# Altium PCB Copy of TQ210_BOARD_V4-20121031.PcbDoc (part 5 of 8)
Units mm, origin at the board's own origin, x right, y up, seen from the top; angles counter-clockwise.
Board outline 191.2 x 131.27 mm, 2 copper layers (TopLayer, BottomLayer); 362 components, 455 nets, 1594 pads, 630 vias.
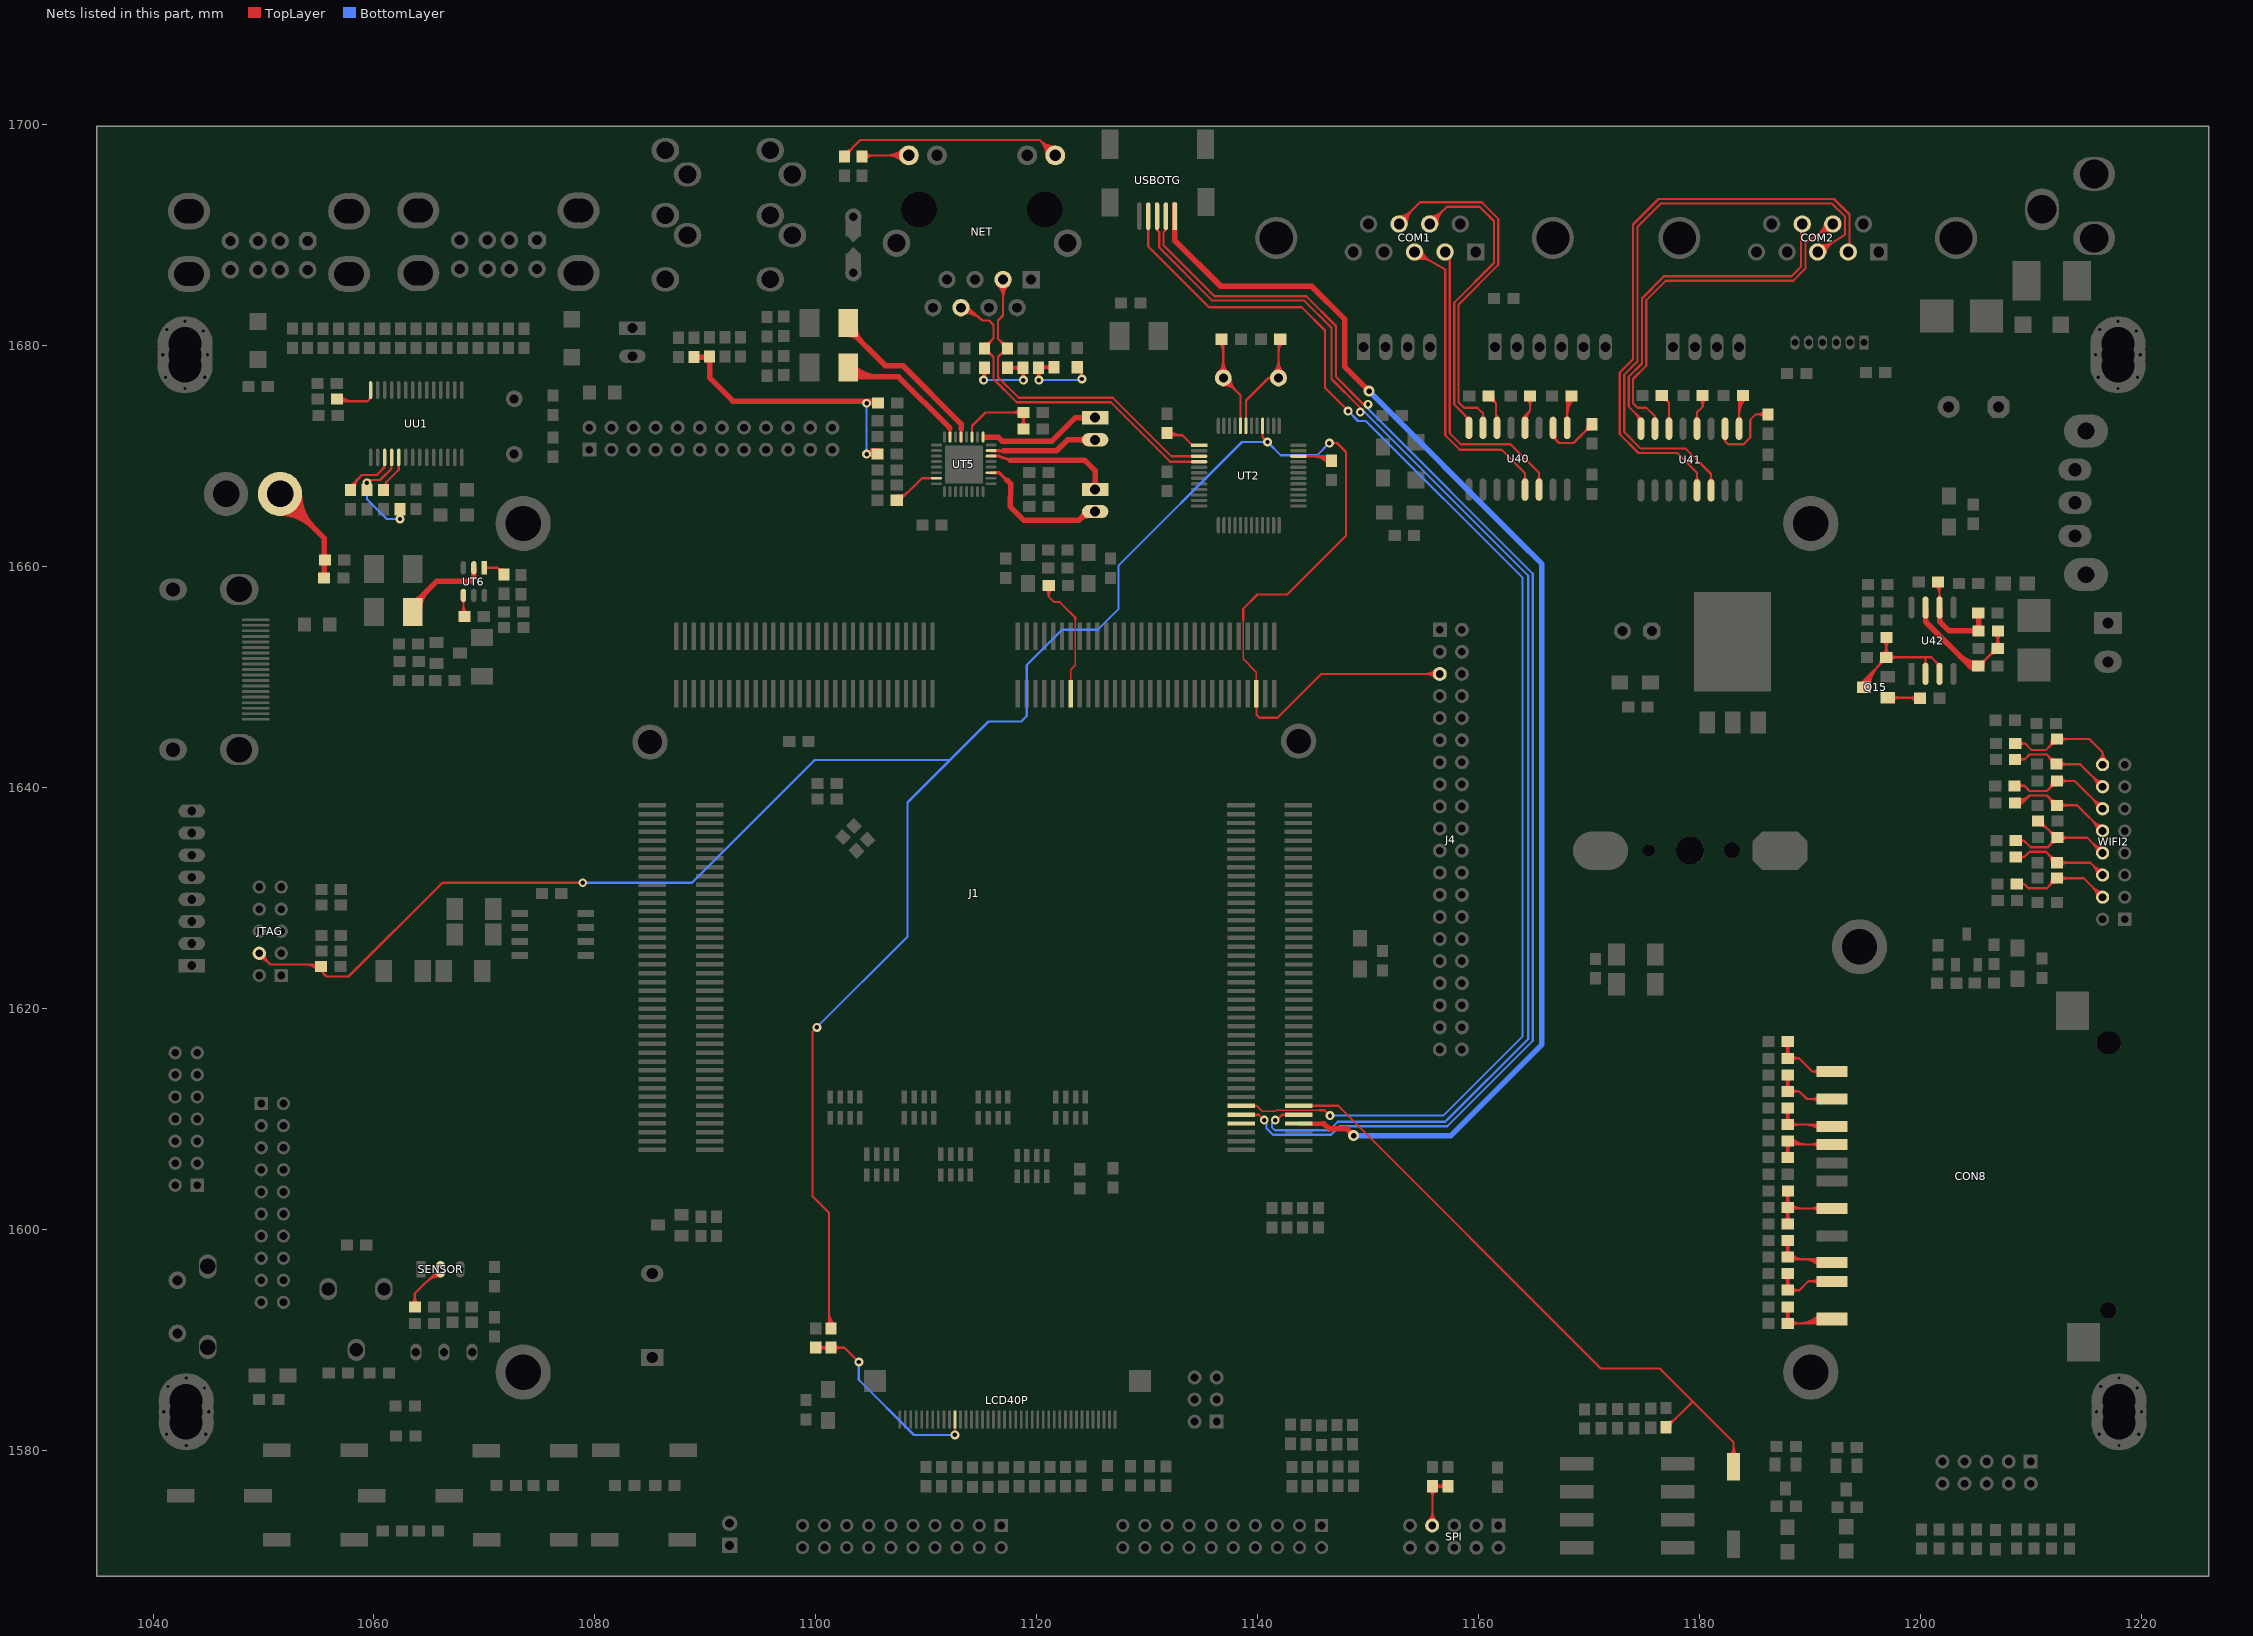
[diagram p5: the nets of this part, all layers, seen from the top]

## Via types
v1: diameter 1, hole 0.5, TopLayer to BottomLayer, 458 vias
v2: diameter 0.8, hole 0.4, TopLayer to BottomLayer, 172 vias

## Nets (pads, with @x,y where several pads share a name; then routed paths per layer and width w, separated by ;. In a path a pad name is that pad's centre, name@x,y a point inside that pad or via, vN(x,y) a via of type N, cw(c..) or ccw(c..) an arc to the next point about the centre after c; other vN are vias at no path point) (continued)
NetR31_1: LCD40P.11 R31.1 R32.1 | length 22.6
  TopLayer w0.2: R31.1@1100.2,1589.3 1102.6,1589.3 v2(1103.9,1588) ; R31.1@1100.283,1589.017 cw(c1100.966,1588.334) 1100.966,1589.3 cw(c1100.966,1590.266) R31.1@1100.283,1589.583 ; R32.1@1101.117,1589.017 ccw(c1100.434,1588.334) 1100.434,1589.3 ccw(c1100.434,1590.266) R32.1@1101.117,1589.583 ; R32.1@1101.683,1589.017 cw(c1102.366,1588.334) 1102.366,1589.3 cw(c1102.366,1590.266) R32.1@1101.683,1589.583 ; v2(1112.6,1581.4) LCD40P.11@1112.6,1582.8
  BottomLayer w0.2: v2(1103.9,1588) 1103.9,1586.4 1108.9,1581.4 v2(1112.6,1581.4)
NetR203_1: R203.1 UT2.34 | length 7.4
  TopLayer w0.2: UT2.34@1143.703,1670.004 1146.496,1670.004 R203.1@1146.5,1670 ; 1144.879,1670.004 cw(c1144.879,1667.829) R203.1@1146.417,1669.367 ; 1145.362,1670.004 cw(c1145.362,1668.312) R203.1@1146.559,1669.509 ; 1145.845,1670.004 cw(c1145.845,1668.795) R203.1@1146.7,1669.65 ; R203.1@1146.328,1670.004 cw(c1146.328,1669.278) R203.1@1146.841,1669.791
NetR206_2: CD2.1 R206.2 R207.2 | length 13.1
  TopLayer w0.2: CD2.1@1119.894,1677.682 cw(c1119.212,1676.999) 1120.177,1676.999 cw(c1121.143,1676.999) CD2.1@1120.46,1677.682 ; v2@1120.177,1676.923 CD2.1@1120.177,1678.015 ; CD2.1@1120.227,1678.065 R206.2@1121.577,1678.065 ; CD2.1@1120.46,1677.782 cw(c1121.143,1677.099) 1121.143,1678.065 cw(c1121.143,1679.031) CD2.1@1120.46,1678.348 ; R206.2@1121.294,1677.782 ccw(c1120.612,1677.099) 1120.612,1678.065 ccw(c1120.612,1679.031) R206.2@1121.294,1678.348 ; R207.2@1123.677,1678.015 cw(c1122.986,1677.17) v2@1124.072,1677.279 ; R207.2@1123.677,1678.065 1124,1678 v2(1124.1,1677)
  BottomLayer w0.2: v2(1120.2,1676.9) v2@1124.1,1676.9
NetR208_1: CD1.1 R208.1 R209.1 | length 13.2
  TopLayer w0.2: R209.1@1114.994,1677.682 cw(c1114.312,1676.999) 1115.277,1676.999 cw(c1116.243,1676.999) R209.1@1115.56,1677.682 ; v2@1115.277,1676.977 R209.1@1115.277,1678.015 ; R208.1@1117.377,1678.015 CD1.1@1118.777,1678.015 1118.777,1676.923 v2(1118.8,1676.9) ; R208.1@1117.66,1677.732 cw(c1118.343,1677.049) 1118.343,1678.015 cw(c1118.343,1678.981) R208.1@1117.66,1678.298 ; CD1.1@1118.494,1677.682 cw(c1117.812,1676.999) 1118.777,1676.999 cw(c1119.743,1676.999) CD1.1@1119.06,1677.682 ; CD1.1@1118.494,1677.732 ccw(c1117.812,1677.049) 1117.812,1678.015 ccw(c1117.812,1678.981) CD1.1@1118.494,1678.298
  BottomLayer w0.2: v2(1115.2,1676.9) v2(1118.8,1676.9)
NetR210_2: NET.9 R210.2 | length 29.3
  TopLayer w0.2: R210.2@1102.5,1697.1 1104.037,1698.637 1120.293,1698.637 NET.9@1121.68,1697.25 NET.9@1121.68,1697.847 ; R210.2@1102.6,1697.6 ccw(c1102.6,1698.566) 1103.283,1697.883 ccw(c1103.966,1697.2) R210.2@1103,1697.2 ; NET.9@1120.88,1697.25 ccw(c1118.949,1697.25) 1120.314,1698.616 ccw(c1121.68,1699.981) NET.9@1121.68,1698.05 ; NET.9@1121.08,1697.25 ccw(c1119.631,1697.25) 1120.656,1698.274 ccw(c1121.68,1699.299) NET.9@1121.68,1697.85 ; NET.9@1121.28,1697.25 ccw(c1120.314,1697.25) 1120.997,1697.933 ccw(c1121.68,1698.616) NET.9@1121.68,1697.65
NetR211_2: NET.12 R211.2 | length 12.6
  TopLayer w0.2: R211.2@1104.341,1697.059 cw(c1104.804,1696.597) 1104.804,1697.25 ; R211.2@1104.483,1696.917 cw(c1105.286,1696.114) 1105.286,1697.25 ; R211.2@1104.483,1697.483 ccw(c1105.045,1698.045) 1105.045,1697.25 ; R211.2@1104.7,1697.25 NET.12@1108.43,1697.25 ; NET.12@1107.864,1696.684 ccw(c1106.499,1695.319) 1106.499,1697.25 ccw(c1106.499,1699.181) NET.12@1107.864,1697.816 ; NET.12@1108.006,1696.826 ccw(c1106.981,1695.801) 1106.981,1697.25 ccw(c1106.981,1698.699) NET.12@1108.006,1697.674 ; NET.12@1108.147,1696.967 ccw(c1107.464,1696.284) 1107.464,1697.25 ccw(c1107.464,1698.216) NET.12@1108.147,1697.533
NetR422_1: Q15.B R422.1 | length 6.2
  TopLayer w0.2: Q15.B@1197.059,1648.135 1199.665,1648.135 R422.1@1199.7,1648.1 ; Q15.B@1197.474,1647.846 cw(c1198.171,1647.15) 1198.171,1648.135 cw(c1198.171,1649.12) Q15.B@1197.474,1648.423 ; 1198.875,1648.135 cw(c1198.875,1647.042) R422.1@1199.647,1647.815 ; 1199.054,1648.135 ccw(c1199.054,1648.974) R422.1@1199.647,1648.38 ; 1199.358,1648.135 cw(c1199.358,1647.525) R422.1@1199.789,1647.956
NetR427_1: Q15.C R421.2 R427.1 U42.2 U42.3 | length 28.7
  TopLayer w0.2: Q15.C@1194.635,1649.1 cw(c1195.444,1649.1) 1194.872,1649.672 ; Q15.C@1194.75,1649.479 ccw(c1194.663,1649.7) 1194.9,1649.7 ; Q15.C@1194.835,1649.1 cw(c1196.127,1649.1) 1195.213,1650.013 ; Q15.C@1194.9,1649.1 1194.9,1649.7 ; Q15.C@1195.035,1649.1 cw(c1196.809,1649.1) 1195.555,1650.355 ; Q15.C@1195.05,1649.479 cw(c1195.137,1649.7) 1194.9,1649.7 ; Q15.C@1195.235,1649.1 cw(c1197.492,1649.1) 1195.896,1650.696 ; Q15.C@1195.435,1649.1 cw(c1198.175,1649.1) 1196.238,1651.038 ; 1196.093,1650.893 ccw(c1195.184,1651.802) R427.1@1196.47,1651.802 ; 1196.413,1651.213 cw(c1196.87,1650.757) R427.1@1196.87,1651.402 ; 1196.435,1651.235 ccw(c1195.867,1651.802) R427.1@1196.67,1651.802 ; R427.1@1196.637,1652.085 ccw(c1195.929,1652.793) 1196.93,1652.793 ; R421.2@1196.647,1653.315 cw(c1195.965,1652.632) 1196.93,1652.632 cw(c1197.896,1652.632) R421.2@1197.213,1653.315 ; R427.1@1196.778,1651.944 ccw(c1196.412,1652.31) 1196.93,1652.31 ; 1196.93,1652.743 ccw(c1197.86,1652.743) R427.1@1197.203,1652.085 ; R421.2@1196.93,1653.598 1196.93,1651.813 R427.1@1196.92,1651.802 ; R427.1@1197.253,1651.52 cw(c1197.935,1650.837) 1197.935,1651.802 cw(c1197.935,1652.768) R427.1@1197.253,1652.085 ; U42.2@1200.355,1651.16 ccw(c1200.056,1651.458) 1200.479,1651.458 ccw(c1200.901,1651.458) U42.2@1200.602,1651.16 ; U42.2@1200.479,1650.311 1200.479,1651.781 ; 1201.437,1651.365 cw(c1201.108,1651.036) U42.3@1201.574,1651.036 ; 1201.481,1651.322 ccw(c1201.749,1651.59) U42.3@1201.749,1651.211 ; U42.3@1201.749,1650.311 1201.749,1651.054 1201,1651.802 R427.1@1196.92,1651.802 ; 1194.9,1649.7 1196.92,1651.72 R427.1@1196.92,1651.802
NetR505_2: C524.2 R504.1 R505.2 R506.1 | length 31.1
  TopLayer w0.5: R505.2@1088.981,1678.983 1090.331,1678.983 R506.1@1090.381,1679.033 1090.381,1677.119 1092.5,1675 R504.1@1105.6,1675 ; R505.2@1089.158,1678.807 cw(c1089.585,1678.38) 1089.585,1678.983 cw(c1089.585,1679.587) R505.2@1089.158,1679.16 ; R506.1@1090.204,1679.16 cw(c1089.777,1679.587) 1089.777,1678.983 cw(c1089.777,1678.38) 1090.204,1678.807 cw(c1089.777,1678.38) 1090.381,1678.38 cw(c1090.985,1678.38) R506.1@1090.558,1678.807 ; v2@1104.549,1675 cw(c1104.549,1673.796) R504.1@1105.401,1674.647 ; v2@1104.8,1670.2 1104.824,1670.224 C524.2@1105.578,1670.224 ; v2@1104.935,1670.335 cw(c1105.365,1669.905) C524.2@1105.641,1670.447 ; v2@1104.943,1670.343 cw(c1105.362,1669.923) C524.2@1105.648,1670.443 ; C524.2@1105.351,1670.047 ccw(c1104.924,1669.62) 1104.924,1670.224 ccw(c1104.924,1670.828) C524.2@1105.351,1670.401
  BottomLayer w0.2: v2(1104.6,1670.2) v2(1104.6,1674.8)
NetRA4_1: RA4.1 SENSOR.2 | length 9.3
  TopLayer w0.2: RA4.1@1063.417,1593.283 ccw(c1062.734,1593.966) 1063.7,1593.966 ccw(c1064.666,1593.966) RA4.1@1063.983,1593.283 ; RA4.1@1063.7,1593 1063.7,1594.2 1065.899,1596.399 SENSOR.2@1066.031,1596.399 ; 1064.696,1595.196 cw(c1066.031,1593.861) SENSOR.2@1066.031,1595.749 ; 1065.037,1595.537 cw(c1066.031,1594.544) SENSOR.2@1066.031,1595.949 ; 1065.379,1595.879 cw(c1066.031,1595.227) SENSOR.2@1066.031,1596.149
NetRS17_2: RS17.2 RS18.2 SPI.7 | length 12.8
  TopLayer w0.2: SPI.7@1155.433,1573.567 ccw(c1154.425,1574.575) 1155.85,1574.575 ; RS18.2@1155.567,1576.417 cw(c1154.884,1575.734) 1155.85,1575.734 cw(c1156.816,1575.734) RS18.2@1156.133,1576.417 ; SPI.7@1155.574,1573.426 ccw(c1154.908,1574.092) 1155.85,1574.092 ; SPI.7@1155.811,1573.189 1155.85,1573.228 RS18.2@1155.85,1576.75 RS17.2@1157.25,1576.75 ; 1155.85,1573.903 ccw(c1156.526,1573.903) SPI.7@1156.048,1573.426 ; 1155.85,1574.386 ccw(c1157.008,1574.386) SPI.7@1156.189,1573.567 ; RS18.2@1156.133,1576.467 cw(c1156.816,1575.784) 1156.816,1576.75 cw(c1156.816,1577.716) RS18.2@1156.133,1577.033 ; RS17.2@1156.967,1576.467 ccw(c1156.284,1575.784) 1156.284,1576.75 ccw(c1156.284,1577.716) RS17.2@1156.967,1577.033
NetRT61_1: RT61.1 UT6.1 | length 3.7
  TopLayer w0.2: UT6.1@1069.995,1659.912 1071.187,1659.912 RT61.1@1071.789,1659.31 ; UT6.1@1070.101,1659.806 cw(c1070.357,1659.55) 1070.357,1659.912 cw(c1070.357,1660.274) UT6.1@1070.101,1660.018 ; RT61.1@1071.39,1659.395 ccw(c1070.775,1659.45) 1071.212,1659.887 ccw(c1071.578,1660.253) RT61.1@1071.697,1659.749
NetRU17_1: RU17.1 UU1.14 | length 6.6
  TopLayer w0.2: RU17.1@1056.59,1674.994 1059.409,1674.994 1059.695,1675.279 UU1.14@1059.695,1676 ; RU17.1@1056.845,1675.322 ccw(c1057.639,1676.116) 1057.639,1674.994 ; RU17.1@1056.987,1674.898 cw(c1057.218,1674.667) 1057.218,1674.994 ; RU17.1@1056.987,1675.464 ccw(c1058.122,1676.598) 1058.122,1674.994 ; 1059.56,1675.144 ccw(c1059.354,1675.35) UU1.14@1059.645,1675.35
NetTVOUT_1: RT62.2 RT63.1 TVOUT.1 | length 23.5
  TopLayer w0.2: RT62.2@1055.49,1660.541 RT62.2@1055.538,1660.59
  TopLayer w0.5: TVOUT.1@1051.492,1666.59 1055.49,1662.591 RT63.1@1055.49,1658.989 ; TVOUT.1@1051.5,1664.85 cw(c1051.5,1660.671) 1054.455,1663.626 ; TVOUT.1@1051.5,1665.35 cw(c1051.5,1662.378) 1053.602,1664.479 ; TVOUT.1@1052.75,1666.6 ccw(c1055.813,1666.6) 1053.647,1664.434 ; TVOUT.1@1053.25,1666.6 ccw(c1057.52,1666.6) 1054.501,1663.58 ; RT63.1@1055.313,1659.165 ccw(c1054.886,1659.592) 1055.49,1659.592 ccw(c1056.094,1659.592) RT63.1@1055.667,1659.165 ; RT62.2@1055.333,1660.435 cw(c1054.955,1660.056) 1055.49,1660.056 ; RT62.2@1055.333,1660.788 ccw(c1054.955,1661.167) 1055.49,1661.167 ; 1055.49,1659.96 cw(c1056.162,1659.96) RT62.2@1055.687,1660.435 ; 1055.49,1661.263 ccw(c1056.162,1661.263) RT62.2@1055.687,1660.788
NetU40_1: C401.2 U40.1 | length 7.9
  TopLayer w0.2: U40.1@1167.884,1673.433 ccw(c1167.545,1673.772) 1168.024,1673.772 ; U40.1@1167.928,1672.481 1168.024,1672.577 C401.2@1168.024,1675.68 ; 1168.024,1673.681 cw(c1170.169,1673.681) C401.2@1168.652,1675.198 ; 1168.024,1673.794 ccw(c1168.534,1673.794) U40.1@1168.173,1673.433 ; 1168.024,1674.164 cw(c1169.686,1674.164) C401.2@1168.511,1675.339 ; 1168.024,1674.646 cw(c1169.203,1674.646) C401.2@1168.369,1675.48
NetU40_2: C404.1 U40.2 | length 8.7
  TopLayer w0.2: U40.2@1166.658,1671.746 U40.2@1166.658,1672.481 ; U40.2@1166.758,1672.577 1166.758,1671.742 1167.3,1671.2 1168.6,1671.2 C404.1@1170.3,1672.9 ; U40.2@1166.963,1671.866 ccw(c1167.758,1671.866) 1167.196,1671.304 ; 1169.532,1672.132 cw(c1170.3,1671.364) C404.1@1170.3,1672.45 ; 1169.653,1672.253 ccw(c1169.055,1672.85) C404.1@1169.9,1672.85 ; C404.1@1169.873,1672.473 cw(c1170.3,1672.046) C404.1@1170.3,1672.65
NetU40_4: C402.1 U40.4 | length 6.6
  TopLayer w0.2: U40.4@1164.026,1673.253 cw(c1164.396,1673.321) 1164.13,1673.587 ; U40.4@1164.118,1672.481 1164.118,1673.575 1164.669,1674.126 ; U40.4@1164.223,1673.289 cw(c1164.851,1673.405) 1164.4,1673.856 ; C402.1@1164.386,1675.198 cw(c1163.704,1674.515) 1164.669,1674.515 cw(c1165.635,1674.515) C402.1@1164.952,1675.198 ; U40.4@1164.42,1673.326 cw(c1165.307,1673.488) 1164.669,1674.126 ; C402.1@1164.669,1675.48 1164.669,1674.126
NetU40_6: C405.1 U40.6 | length 5.2
  TopLayer w0.2: C405.1@1160.919,1675.48 1161.578,1674.821 U40.6@1161.578,1672.481 ; C405.1@1160.975,1675.08 cw(c1160.988,1674.281) 1161.553,1674.846 cw(c1162.027,1675.32) C405.1@1161.365,1675.42 ; 1161.578,1674.024 ccw(c1162.414,1674.024) U40.6@1161.823,1673.433
NetU41_1: C411.2 U41.1 | length 7
  TopLayer w0.2: U41.1@1183.455,1673.356 ccw(c1183.106,1673.706) 1183.6,1673.706 ccw(c1184.094,1673.706) U41.1@1183.745,1673.356 ; U41.1@1183.6,1672.7 1183.6,1675.3 C411.2@1183.65,1675.35 ; 1183.6,1673.81 cw(c1185.59,1673.81) C411.2@1184.183,1675.217 ; 1183.6,1674.293 cw(c1185.107,1674.293) C411.2@1184.041,1675.359 ; 1183.6,1674.776 cw(c1184.624,1674.776) C411.2@1183.9,1675.5
NetU41_2: C414.1 U41.2 | length 9.5
  TopLayer w0.2: U41.2@1182.204,1671.627 cw(c1182.004,1671.37) 1182.33,1671.37 ; U41.2@1182.33,1672.7 1182.33,1671.37 ; U41.2@1182.456,1671.627 ccw(c1182.656,1671.37) 1182.33,1671.37 ; C414.1@1185.917,1673.517 ccw(c1185.234,1672.834) 1185.234,1673.8 ccw(c1185.234,1674.766) C414.1@1185.917,1674.083 ; C414.1@1186.2,1673.8 1185.1,1673.8 1184.6,1673.3 1184.6,1671.7 1184,1671.1 1182.6,1671.1 1182.33,1671.37
NetU41_4: C412.1 U41.4 | length 5.5
  TopLayer w0.2: U41.4@1179.645,1673.356 ccw(c1179.296,1673.706) 1179.79,1673.706 ccw(c1180.284,1673.706) U41.4@1179.935,1673.356 ; U41.4@1179.79,1672.5 1179.79,1673.99 1180.3,1674.5 C412.1@1180.3,1675.5 ; C412.1@1180.017,1675.217 cw(c1179.334,1674.534) 1180.3,1674.534 cw(c1181.266,1674.534) C412.1@1180.583,1675.217
NetU41_6: C415.1 U41.6 | length 5.1
  TopLayer w0.2: C415.1@1176.6,1675.5 1177.25,1674.85 U41.6@1177.25,1672.7 ; C415.1@1176.661,1675.1 cw(c1176.681,1674.331) 1177.225,1674.875 cw(c1177.681,1675.331) C415.1@1177.045,1675.435 ; U41.6@1177.105,1673.356 ccw(c1176.756,1673.706) 1177.25,1673.706 ccw(c1177.744,1673.706) U41.6@1177.395,1673.356
NetU42_6: R425.1 R426.1 R429.2 U42.6 | length 14.7
  TopLayer w0.2: R425.1@1201.387,1658.32 cw(c1200.514,1657.446) 1201.749,1657.446 ; R425.1@1201.528,1658.461 cw(c1200.997,1657.929) 1201.749,1657.929 ; U42.6@1201.625,1657.16 ccw(c1201.326,1657.458) 1201.749,1657.458 ccw(c1202.171,1657.458) U42.6@1201.872,1657.16 ; U42.6@1201.749,1656.311 1201.749,1658.549 R425.1@1201.8,1658.6 ; 1201.749,1657.827 cw(c1202.445,1657.827) R425.1@1201.953,1658.32
  TopLayer w0.5: U42.6@1201.749,1656.311 1201.749,1655.051 1202.602,1654.198 R426.1@1205.28,1654.198 1205.28,1655.77 R429.2@1205.25,1655.8 ; R426.1@1205.053,1654.021 ccw(c1204.627,1653.594) 1204.627,1654.198 ccw(c1204.627,1654.801) R426.1@1205.053,1654.374 ; R426.1@1205.103,1654.374 ccw(c1204.677,1654.801) 1205.28,1654.801 ccw(c1205.884,1654.801) R426.1@1205.457,1654.374 ; R429.2@1205.123,1655.623 cw(c1204.744,1655.244) 1205.28,1655.244 ; 1205.28,1655.149 cw(c1205.951,1655.149) R429.2@1205.477,1655.623
NetU42_7: R424.1 R426.2 R428.2 U42.7 | length 21.9
  TopLayer w0.2: R428.2@1205.3,1651.4 ccw(c1205.3,1652.366) 1205.983,1651.683 ccw(c1206.666,1651) R428.2@1205.7,1651 ; R428.2@1205.5,1651.2 1207.03,1652.73 R426.2@1207.03,1654.198 ; 1206.172,1651.872 cw(c1206.97,1651.074) R424.1@1206.97,1652.202 ; 1206.335,1652.035 ccw(c1205.767,1652.602) R424.1@1206.57,1652.602 ; R424.1@1206.513,1652.213 cw(c1206.97,1651.757) R424.1@1206.97,1652.402 ; R424.1@1206.737,1652.885 ccw(c1206.029,1653.593) 1207.03,1653.593 ; R426.2@1206.747,1653.915 cw(c1206.065,1653.232) 1207.03,1653.232 cw(c1207.996,1653.232) R426.2@1207.313,1653.915 ; R424.1@1206.878,1652.744 ccw(c1206.512,1653.11) 1207.03,1653.11 ; 1207.03,1653.543 ccw(c1207.96,1653.543) R424.1@1207.303,1652.885
  TopLayer w0.5: U42.7@1200.479,1656.311 1200.479,1655.021 1204.5,1651 R428.2@1205.25,1651 ; 1203.578,1651.922 ccw(c1205.2,1653.543) R428.2@1205.2,1651.25 ; 1204.432,1651.068 ccw(c1205.2,1651.836) R428.2@1205.2,1650.75 ; R428.2@1205.023,1650.823 ccw(c1204.596,1650.396) 1204.596,1651 ccw(c1204.596,1651.604) R428.2@1205.023,1651.177
NetUT2_1: R204.1 UT2.1 | length 5.5
  TopLayer w0.2: R204.1@1131.9,1671.9 1133.2,1671.9 1134.096,1671.004 UT2.1@1134.703,1671.004 ; R204.1@1131.941,1672.191 ccw(c1132.645,1672.895) 1132.645,1671.9 ; R204.1@1132.083,1671.767 cw(c1132.404,1671.446) 1132.404,1671.9 ; R204.1@1132.083,1672.333 ccw(c1133.128,1673.378) 1133.128,1671.9
NetUT5_7: C527.1 UT5.7 | length 6.6
  TopLayer w0.2: C527.1@1107.378,1666.224 ccw(c1107.378,1667.311) 1108.146,1666.542 ; C527.1@1107.378,1666.424 ccw(c1107.378,1667.994) 1108.488,1666.884 ; C527.1@1107.525,1665.921 1109.628,1668.024 UT5.7@1110.928,1668.024 ; C527.1@1107.778,1666.024 cw(c1108.139,1666.024) 1107.884,1666.28
NetUT5_19: SPKR.2 UT5.19 | length 14.1
  TopLayer w0.3: UT5.19@1115.878,1668.524 1116.631,1668.524 1117.304,1667.851
  TopLayer w0.5: 1117.304,1667.851 1117.634,1667.521 1117.628,1665.424 1118.828,1664.224 1123.824,1664.224 1124.6,1665 1125.299,1665 SPKR.2@1125.302,1664.998 ; 1123.927,1664.327 cw(c1124.702,1663.552) SPKR.2@1124.702,1664.648 ; 1124.178,1664.578 ccw(c1123.757,1664.998) SPKR.2@1124.352,1664.998
NetUT5_22: SPKR.1 UT5.22 | length 13.2
  TopLayer w0.3: UT5.22@1115.878,1670.024 1116.6,1670 1117.609,1669.655
  TopLayer w0.5: 1117.609,1669.655 1124.345,1669.655 1125.302,1668.698 SPKR.1@1125.302,1666.998 SPKR.1@1125.057,1666.998 ; SPKR.1@1125.054,1667.245 ccw(c1124.457,1667.843) 1125.302,1667.843 ccw(c1126.147,1667.843) SPKR.1@1125.549,1667.245
NetUT5_23: SPKL.2 UT5.23 | length 11.2
  TopLayer w0.3: UT5.23@1115.884,1670.518 1117.024,1670.518
  TopLayer w0.5: 1117.024,1670.518 1121.818,1670.518 1122.798,1671.498 SPKL.2@1125.302,1671.498 ; SPKL.2@1124.454,1671.25 ccw(c1123.857,1670.653) 1123.857,1671.498 ccw(c1123.857,1672.343) SPKL.2@1124.454,1671.745
NetUT5_25: SPKL.1 UT5.25 | length 13.6
  TopLayer w0.2: UT5.25@1115.153,1671.749 1116.505,1671.749
  TopLayer w0.5: 1115.387,1671.749 1116.505,1671.749 1116.897,1671.356 1121.356,1671.356 1123.498,1673.498 SPKL.1@1125.302,1673.498 ; SPKL.1@1124.454,1673.25 ccw(c1123.857,1672.653) 1123.857,1673.498 ccw(c1123.857,1674.343) SPKL.1@1124.454,1673.745
NetUT5_27: C510.1 C512.1 UT5.27 | length 12.2
  TopLayer w0.2: UT5.27@1114.153,1671.749 1114.153,1672.752 1115.374,1673.973 C510.1@1118.808,1673.973 C512.1@1118.808,1672.473 ; C510.1@1118.475,1673.69 ccw(c1117.792,1673.008) 1117.792,1673.973 ccw(c1117.792,1674.939) C510.1@1118.475,1674.256 ; C512.1@1118.525,1672.756 ccw(c1117.842,1673.439) 1118.808,1673.439 ccw(c1119.773,1673.439) C512.1@1119.091,1672.756 ; C510.1@1118.525,1673.69 cw(c1117.842,1673.008) 1118.808,1673.008 cw(c1119.773,1673.008) C510.1@1119.091,1673.69
NetUT5_29: C516.1 UT5.29 | length 18.2
  TopLayer w0.2: UT5.29@1113.153,1671.418 UT5.29@1113.164,1671.407
  TopLayer w0.3: UT5.29@1113.153,1671.418 1113.153,1672.459
  TopLayer w0.5: C516.1@1102.939,1681.034 cw(c1102.939,1679.763) 1103.838,1680.662 ; C516.1@1102.939,1682.054 1102.939,1681.561 1106.3,1678.2 1107.9,1678.2 1113.153,1672.947 1113.153,1672.459 ; C516.1@1103.578,1681.673 ccw(c1105.391,1681.673) 1104.109,1680.391
NetUT5_31: C515.1 UT5.31 | length 15.9
  TopLayer w0.2: 1112.148,1672.398 1112.153,1672.393
  TopLayer w0.3: UT5.31@1112.153,1671.749 1112.153,1672.393
  TopLayer w0.5: C515.1@1102.9,1677.3 1103,1677.3 1103.1,1677.2 1107.5,1677.2 1112.1,1672.6 1112.148,1672.552 ; C515.1@1103.037,1677.772 ccw(c1104.417,1679.152) 1104.417,1677.2 ; C515.1@1103.391,1678.125 ccw(c1105.624,1680.359) 1105.624,1677.2
NetUT6_2: CT61.1 UT6.2 | length 10
  TopLayer w0.5: CT61.1@1063.4,1656.5 1063.5,1656.5 1065.7,1658.7 1068.7,1658.7 1069.045,1659.045 UT6.2@1069.045,1659.912 ; CT61.1@1063.506,1656.928 ccw(c1063.506,1657.948) 1064.227,1657.227 ; CT61.1@1064.145,1656.289 cw(c1066.211,1656.289) 1064.75,1657.75
NetUT6_4: CT63.1 UT6.4 | length 4.4
  TopLayer w0.2: CT63.1@1067.857,1655.789 ccw(c1067.283,1656.363) 1068.095,1656.363 ; UT6.4@1067.989,1656.956 cw(c1067.732,1656.7) 1068.095,1656.7 cw(c1068.457,1656.7) UT6.4@1068.201,1656.956 ; CT63.1@1068.095,1655.601 UT6.4@1068.095,1657.412 ; 1068.095,1656.097 ccw(c1068.731,1656.097) CT63.1@1068.281,1655.647 ; 1068.095,1656.58 ccw(c1069.214,1656.58) CT63.1@1068.422,1655.789
NetUU1_17: RU18.1 UU1.17 | length 7.7
  TopLayer w0.2: RU18.1@1057.8,1667.2 1058.923,1668.323 1060.273,1668.323 1060.3,1668.35 1060.965,1669.015 UU1.17@1060.965,1669.904 ; RU18.1@1057.865,1667.408 ccw(c1057.865,1667.753) 1058.109,1667.509 ; RU18.1@1058.065,1667.008 cw(c1059.168,1667.008) 1058.388,1667.788 ; RU18.1@1058.265,1667.008 cw(c1059.851,1667.008) 1058.73,1668.13 ; 1060.711,1668.761 ccw(c1060.217,1669.254) UU1.17@1060.915,1669.254
NetUU1_18: RU20.2 RU21.1 UU1.18 | length 11
  TopLayer w0.2: RU21.1@1059.126,1667.329 ccw(c1058.77,1667.805) v2@1059.365,1667.805 ; RU21.1@1059.365,1667.043 v2@1059.365,1667.805 ; RU21.1@1059.604,1667.329 cw(c1059.96,1667.805) v2@1059.365,1667.805 ; UU1.18@1061.6,1669.904 1061.6,1668.9 1060.55,1667.85 1059.41,1667.85 v2@1059.365,1667.805
  BottomLayer w0.2: v2@1059.365,1667.805 1059.365,1666.122 1061.162,1664.326 v2(1062.356,1664.326)
  other v2: 1059.365,1667.6
NetUU1_19: RU19.1 UU1.19 | length 4.2
  TopLayer w0.2: RU19.1@1060.861,1667.408 ccw(c1060.858,1667.665) 1061.115,1667.665 ; RU19.1@1060.863,1667.208 ccw(c1060.86,1667.463) RU19.1@1061.115,1667.463 ; RU19.1@1061.115,1666.958 1061.115,1667.665 ; UU1.19@1062.235,1669.904 1062.235,1668.785 1061.115,1667.665
NetX6_1: C207.2 UT2.43 X6.1 | length 16.6
  TopLayer w0.2: UT2.43@1138.953,1672.754 1138.953,1675.053 1141,1677.1 ; X6.1@1141.268,1676.903 ccw(c1141,1676.819) 1141,1677.1 ; X6.1@1141.268,1677.297 cw(c1141,1677.381) 1141,1677.1 ; X6.1@1141.432,1677.568 ccw(c1140.302,1678.698) 1141.9,1678.698 ccw(c1143.498,1678.698) X6.1@1142.368,1677.568 ; X6.1@1141.573,1677.427 ccw(c1140.785,1678.215) 1141.9,1678.215 ccw(c1143.015,1678.215) X6.1@1142.227,1677.427 ; C207.2@1141.717,1680.317 cw(c1141.276,1679.876) 1141.9,1679.876 cw(c1142.724,1679.876) C207.2@1142.141,1680.459 ; 1141.9,1679.393 cw(c1143.207,1679.393) C207.2@1142.283,1680.317 ; C207.2@1141.9,1680.5 X6.1@1141.9,1677.1 1141,1677.1
NetX6_2: C208.2 UT2.44 X6.2 | length 19
  TopLayer w0.2: X6.2@1136.428,1677.568 ccw(c1135.298,1678.698) 1136.896,1678.698 ccw(c1138.494,1678.698) X6.2@1137.364,1677.568 ; C208.2@1136.517,1680.317 cw(c1135.602,1679.402) 1136.896,1679.402 ; X6.2@1136.57,1677.427 ccw(c1135.781,1678.215) 1136.896,1678.215 ccw(c1138.012,1678.215) X6.2@1137.223,1677.427 ; C208.2@1136.659,1680.459 cw(c1136.085,1679.885) 1136.896,1679.885 ; X6.2@1136.896,1676.438 cw(c1136.896,1674.84) 1138.026,1675.97 cw(c1139.156,1677.1) X6.2@1137.558,1677.1 ; X6.2@1136.896,1676.638 cw(c1136.896,1675.523) 1137.685,1676.311 cw(c1138.474,1677.1) X6.2@1137.358,1677.1 ; 1136.896,1679.867 cw(c1137.533,1679.867) C208.2@1137.083,1680.317 ; C208.2@1136.9,1680.4 1136.896,1680.396 X6.2@1136.896,1677.1 1138.453,1675.543 UT2.44@1138.453,1672.754
NRESET: J1.196 J4.5 JTAG.4 R32.2 R65.1 UT2.40 | length 245.2
  TopLayer w0.135: 1138.695,1655.195 1138.695,1651.663 1139.893,1650.465 J1.196@1139.896,1648.506
  TopLayer w0.2: JTAG.4@1049.612,1624.504 cw(c1049.612,1623.296) 1050.466,1624.15 cw(c1051.319,1625.004) JTAG.4@1050.112,1625.004 ; JTAG.4@1049.612,1624.704 cw(c1049.612,1623.979) 1050.124,1624.491 cw(c1050.636,1625.004) JTAG.4@1049.912,1625.004 ; JTAG.4@1049.612,1625.004 1050.616,1624 1054.6,1624 1055.004,1623.596 1055.7,1622.9 1057.7,1622.9 1066.2,1631.4 v2(1078.9,1631.4) ; 1053.717,1624 cw(c1053.717,1622.359) R65.1@1054.878,1623.519 ; 1054.2,1624 cw(c1054.2,1622.842) R65.1@1055.019,1623.661 ; R65.1@1054.683,1624 cw(c1054.683,1623.324) R65.1@1055.161,1623.802 ; v2(1100.1,1618.3) 1099.7,1617.9 1099.7,1603 1101.19,1601.51 1101.19,1591.11 R32.2@1101.3,1591 ; R32.2@1101.117,1591.383 ccw(c1100.941,1591.559) R32.2@1101.19,1591.559 ; 1101.19,1591.607 ccw(c1101.907,1591.607) R32.2@1101.4,1591.1 ; 1101.19,1592.09 ccw(c1102.39,1592.09) R32.2@1101.541,1591.241 ; 1101.19,1592.573 ccw(c1102.873,1592.573) R32.2@1101.683,1591.383 ; 1138.7,1655.2 1138.7,1656.209 1139.991,1657.5 1142.7,1657.5 1148,1662.8 1148,1670.4 1147.2,1671.2 v2(1146.5,1671.2) ; J1.196@1139.896,1648.506 1139.896,1646.604 1140.174,1646.326 1141.806,1646.326 1145.78,1650.3 J4.5@1156.5,1650.3 ; UT2.40@1140.453,1672.754 1140.453,1671.747 v2(1140.9,1671.3) ; J4.5@1156.122,1649.922 ccw(c1155.208,1649.008) 1155.208,1650.3 ccw(c1155.208,1651.592) J4.5@1156.122,1650.678 ; J4.5@1156.263,1650.063 ccw(c1155.691,1649.491) 1155.691,1650.3 ccw(c1155.691,1651.109) J4.5@1156.263,1650.537 ; R65.1@1054.673,1624 ccw(c1054.673,1624.29) 1054.878,1624.085 cw(c1054.673,1624.29) R65.1@1054.673,1624
  BottomLayer w0.2: v2(1078.9,1631.4) 1088.801,1631.4 1099.901,1642.5 1112.135,1642.5 ; v2(1100.1,1618.3) 1108.298,1626.498 1108.298,1638.662 1115.632,1645.997 1118.6,1645.997 1119.1,1646.497 1119.1,1651.1 1122.3,1654.3 1125.534,1654.3 1127.4,1656.166 1127.4,1660.1 1138.6,1671.3 v2(1140.9,1671.3) 1142.1,1670.1 1145.4,1670.1 v2(1146.5,1671.2) ; 1108.298,1642.498 1108.3,1642.5
OTG_DM: J1.272 USBOTG.2 | length 125.3
  TopLayer w0.2: 1131.591,1690.397 ccw(c1131.451,1690.537) USBOTG.2@1131.616,1690.645 ; USBOTG.2@1131.7,1691.75 1131.7,1690.506 1131.494,1690.3 1131.494,1689.1 1136.094,1684.5 1144.4,1684.5 1147.1,1681.8 1147.1,1677.2 1149.6,1674.7 v2(1150,1674.7) ; J1.272@1138.525,1610.384 1140.116,1610.384 v2(1140.6,1609.9) ; J1.272@1139.635,1610.324 cw(c1139.781,1610.178) 1139.781,1610.384 ; J1.272@1139.635,1610.465 ccw(c1139.831,1610.661) 1139.831,1610.384
  BottomLayer w0.2: v2(1140.6,1609.9) 1140.817,1609.683 1140.817,1609.165 1141.4,1608.582 1146.658,1608.582 1147.426,1609.35 1157.179,1609.35 1164.92,1617.091 1164.92,1659.38 1150,1674.3 v2(1150,1674.7)
OTG_DP: J1.271 USBOTG.3 | length 124.4
  TopLayer w0.2: USBOTG.3@1130.9,1691.75 1130.9,1690.494 ; USBOTG.3@1130.978,1690.637 ccw(c1131.115,1690.527) 1130.991,1690.403 ; v2@1141.726,1609.9 1142.21,1610.384 J1.271@1143.725,1610.384 ; v2(1149.3,1674) 1149.3,1674.4 1146.7,1677 1146.7,1681.634 1144.234,1684.1 1135.91,1684.1 1131.094,1688.916 1131.094,1690.3 1130.9,1690.494 ; 1130.9,1690.494 cw(c1131.063,1690.494) 1130.962,1690.621 ccw(c1131.063,1690.494) 1130.9,1690.494 ; 1130.9,1690.494 ccw(c1130.737,1690.494) 1130.838,1690.621 cw(c1130.737,1690.494) 1130.9,1690.494
  BottomLayer w0.2: v2@1141.383,1609.683 v2(1141.6,1609.9) 1141.298,1609.598 1141.298,1609.268 1141.578,1608.988 1146.488,1608.988 1147.25,1609.75 1157,1609.75 1157.25,1610 1164.5,1617.25 1164.5,1659.2 1149.7,1674 v2(1149.3,1674)
OTG_DRVVBUS: J1.274
OTG_ID: J1.270 USBOTG.4 | length 123.5
  TopLayer w0.135: J1.270@1138.515,1611.195 1139.905,1611.195 1140.41,1610.69 1141.618,1610.69 1141.722,1610.795 1145.605,1610.795 ; J1.270@1139.658,1611.101 cw(c1139.884,1610.875) 1139.884,1611.195 cw(c1139.884,1611.514) J1.270@1139.658,1611.288
  TopLayer w0.2: USBOTG.4@1130.029,1690.629 cw(c1129.859,1690.459) 1130.1,1690.459 cw(c1130.341,1690.459) USBOTG.4@1130.171,1690.629 ; USBOTG.4@1130.1,1691.75 1130.1,1688.995 1135.595,1683.5 1144,1683.5 1146.1,1681.4 1146.1,1676.2 v2(1148.2,1674.1) ; 1145.605,1610.795 1146.071,1610.795 v2(1146.556,1610.309)
  BottomLayer w0.2: v2(1146.556,1610.309) 1156.809,1610.309 1164,1617.5 1164,1659 1149.8,1673.2 1149.1,1673.2 v2(1148.2,1674.1) v2@1148.2,1674.2
OTG_VBUS: J1.273 USBOTG.1 | length 120.5
  TopLayer w0.2: USBOTG.1@1132.484,1692.783 USBOTG.1@1132.5,1692.767
  TopLayer w0.4: J1.273@1143.725,1609.584 1145.99,1609.584
  TopLayer w0.5: USBOTG.1@1132.5,1692.767 1132.5,1689.567 1136.667,1685.4 1144.9,1685.4 1147.9,1682.4 1147.9,1678.1 v1(1150.1,1675.9) ; 1145.99,1609.584 1146.5,1609.1 1148.1,1609.1 v1(1148.69,1608.506)
  BottomLayer w0.5: v1(1148.69,1608.506) 1157.506,1608.506 1165.75,1616.75 1165.75,1660.25 1163.558,1662.442 v1(1150.1,1675.9)
PWRHOLD: J1.154 RT2.1 | length 12.8
  TopLayer w0.135: J1.154@1123.096,1648.506 1123.096,1650.696 1123.497,1651.097 1123.497,1655.197
  TopLayer w0.2: RT2.1@1120.817,1658.017 cw(c1120.134,1657.334) 1121.1,1657.334 cw(c1122.066,1657.334) RT2.1@1121.383,1658.017 ; RT2.1@1121.1,1658.3 1121.1,1657.3 1121.6,1656.8 1122.1,1656.8 1123.497,1655.403 1123.497,1655.197
PWRON: J1.269 KEYON.1 RT1.1 | length 62.9
  TopLayer w0.2: J1.269@1143.715,1611.195 1147.305,1611.195 1171.1,1587.4 1176.434,1587.4 1183.098,1580.737 KEYON.1@1183.098,1578.502 ; RT1.1@1176.9,1582 1176.967,1582 1179.401,1584.434 ; RT1.1@1177,1582.35 ccw(c1177,1583.115) 1177.541,1582.574 ; RT1.1@1177,1582.55 ccw(c1177,1583.798) 1177.882,1582.915 ; RT1.1@1177.4,1582.15 cw(c1178.084,1582.15) 1177.6,1582.633 ; KEYON.1@1182.744,1579.506 ccw(c1181.891,1580.359) 1183.098,1580.359 ccw(c1184.305,1580.359) KEYON.1@1183.451,1579.506 ; KEYON.1@1182.886,1579.364 ccw(c1182.373,1579.877) 1183.098,1579.877 ccw(c1183.822,1579.877) KEYON.1@1183.31,1579.364
RSCTS0: COM1.7 U40.8 | length 33
  TopLayer w0.2: COM1.7@1155.584,1691.04 1157.144,1692.6 1160.1,1692.6 1161.4,1691.3 1161.4,1687.5 1157.8,1683.9 1157.8,1674.7 1159.138,1673.362 U40.8@1159.138,1672.577 ; COM1.7@1155.584,1691.527 ccw(c1155.584,1692.704) 1156.416,1691.872 ccw(c1157.249,1691.04) COM1.7@1156.072,1691.04 ; COM1.7@1155.584,1691.727 ccw(c1155.584,1693.387) 1156.758,1692.213 ccw(c1157.931,1691.04) COM1.7@1156.272,1691.04 ; 1158.737,1673.763 cw(c1158.263,1673.289) U40.8@1158.934,1673.289 ; 1158.913,1673.587 ccw(c1159.138,1673.812) U40.8@1159.138,1673.493
RSCTS1: COM2.8 U41.8 | length 33.3
  TopLayer w0.2: 1174.234,1673.866 cw(c1173.579,1673.211) U41.8@1174.505,1673.211 ; 1174.575,1673.525 cw(c1174.262,1673.211) U41.8@1174.705,1673.211 ; U41.8@1174.71,1672.5 1174.71,1673.39 1173.6,1674.5 1173.6,1677.2 1174.8,1678.4 1174.8,1684.3 1176.8,1686.3 1188.334,1686.3 1189.2,1687.166 1189.2,1690.924 COM2.8@1189.316,1691.04
RSRTS0: COM1.8 U40.7 | length 38.5
  TopLayer w0.2: COM1.8@1152.7,1691 1154.7,1693 1160.3,1693 1161.8,1691.5 1161.8,1687.334 1158.2,1683.734 1158.2,1674.9 1158.7,1674.4 1159.9,1674.4 1160.408,1673.892 U40.7@1160.408,1672.577 ; COM1.8@1152.816,1691.527 ccw(c1152.816,1692.521) 1153.518,1691.818 ; COM1.8@1152.816,1691.727 ccw(c1152.816,1693.204) 1153.86,1692.16 ; COM1.8@1153.103,1691.04 cw(c1153.98,1691.04) 1153.36,1691.66 ; COM1.8@1153.303,1691.04 cw(c1154.663,1691.04) 1153.701,1692.001 ; COM1.8@1153.503,1691.04 cw(c1155.346,1691.04) 1154.043,1692.343 ; U40.7@1160.264,1673.433 ccw(c1159.914,1673.783) 1160.408,1673.783 ccw(c1160.903,1673.783) U40.7@1160.553,1673.433
RSRTS1: COM2.7 U41.7 | length 39.4
  TopLayer w0.2: U41.7@1175.857,1673.375 ccw(c1175.674,1673.62) 1175.98,1673.62 ; U41.7@1175.98,1672.5 1175.98,1673.62 ; U41.7@1176.103,1673.375 cw(c1176.286,1673.62) 1175.98,1673.62 ; COM2.7@1191.407,1691.159 cw(c1189.773,1691.447) 1190.725,1690.088 cw(c1191.677,1688.729) COM2.7@1191.965,1690.363 ; COM2.7@1191.604,1691.125 cw(c1190.446,1691.329) 1191.121,1690.365 cw(c1191.796,1689.401) COM2.7@1192,1690.56 ; COM2.7@1192.084,1691.04 1189.6,1689.3 1189.6,1687 1188.5,1685.9 1176.966,1685.9 1175.2,1684.134 1175.2,1678.2 1174,1677 1174,1674.8 1174.4,1674.4 1175.2,1674.4 1175.98,1673.62
RSRXD0: COM1.3 U40.13 | length 33.6
  TopLayer w0.2: COM1.3@1154.213,1688.5 1157,1686.9 1157,1671.9 1158.3,1670.6 1162.1,1670.6 1164.218,1668.482 U40.13@1164.218,1666.989 ; COM1.3@1154.34,1688.03 cw(c1154.647,1686.894) 1155.233,1687.914 cw(c1155.819,1688.935) COM1.3@1154.683,1688.627 ; COM1.3@1154.392,1687.836 cw(c1154.826,1686.235) 1155.652,1687.674 cw(c1156.478,1689.113) COM1.3@1154.876,1688.68 ; U40.13@1164.074,1667.845 ccw(c1163.724,1668.195) 1164.218,1668.195 ccw(c1164.713,1668.195) U40.13@1164.363,1667.845
RSRXD1: COM2.2 U41.13 | length 54.8
  TopLayer w0.2: U41.13@1179.645,1667.768 ccw(c1179.296,1668.118) 1179.79,1668.118 ccw(c1180.284,1668.118) U41.13@1179.935,1667.768 ; U41.13@1179.79,1666.912 1179.79,1668.51 1178,1670.3 1174.5,1670.3 1172.8,1672 1172.8,1677.6 1174,1678.8 1174,1691 1176.3,1693.3 1192.2,1693.3 1193.6,1691.9 COM2.2@1193.6,1688.5
RSTXD0: COM1.2 U40.14 | length 28.4
  TopLayer w0.2: COM1.2@1156.981,1688.5 1157.4,1688.081 1157.4,1672.1 1158.4,1671.1 1162.9,1671.1 1165.488,1668.512 U40.14@1165.488,1666.989 ; U40.14@1165.344,1667.845 ccw(c1164.994,1668.195) 1165.488,1668.195 ccw(c1165.983,1668.195) U40.14@1165.633,1667.845
RSTXD1: COM2.3 U41.14 | length 60
  TopLayer w0.2: U41.14@1180.915,1667.768 ccw(c1180.566,1668.118) 1181.06,1668.118 ccw(c1181.554,1668.118) U41.14@1181.205,1667.768 ; U41.14@1181.06,1666.912 1181.06,1668.4 1178.76,1670.7 1174.7,1670.7 1173.2,1672.2 1173.2,1677.4 1174.4,1678.6 1174.4,1690.8 1176.5,1692.9 1192,1692.9 1193.2,1691.7 1193.2,1690.1 COM2.3@1190.713,1688.5 ; COM2.3@1190.816,1688.976 ccw(c1191.066,1690.126) 1191.702,1689.137 ccw(c1192.339,1688.147) COM2.3@1191.189,1688.397 ; COM2.3@1190.859,1689.172 ccw(c1191.211,1690.794) 1192.109,1689.398 ccw(c1193.006,1688.002) COM2.3@1191.385,1688.354
RX+: NET.3 R208.2 UT2.3 | length 38
  TopLayer w0.2: NET.3@1116.474,1685.514 cw(c1115.3,1684.34) 1116.96,1684.34 cw(c1118.62,1684.34) NET.3@1117.446,1685.514 ; 1116.609,1680.533 ccw(c1117.377,1681.301) R208.2@1117.377,1680.215 ; NET.3@1116.615,1685.655 cw(c1115.783,1684.823) 1116.96,1684.823 cw(c1118.137,1684.823) NET.3@1117.305,1685.655 ; 1116.73,1680.412 cw(c1116.132,1679.815) R208.2@1116.977,1679.815 ; 1116.76,1679.26 cw(c1117.376,1678.644) R208.2@1117.377,1679.515 ; 1116.809,1679.309 ccw(c1116.403,1679.715) R208.2@1116.977,1679.715 ; R208.2@1116.95,1680.192 ccw(c1117.377,1680.619) R208.2@1117.377,1680.015 ; R208.2@1116.96,1679.46 1116.5,1679 1116.5,1677.166 1118.366,1675.3 1126.9,1675.3 1132.196,1670.004 UT2.3@1134.703,1670.004 ; NET.3@1116.96,1686 1116.96,1682.76 1116.5,1682.3 1116.5,1680.642 R208.2@1117.377,1679.765
RX-: NET.6 R209.2 UT2.4 | length 38.6
  TopLayer w0.2: NET.6@1113.141,1683.572 cw(c1113.232,1682.462) 1113.97,1683.297 ; NET.6@1113.157,1683.373 cw(c1113.286,1681.813) 1114.322,1682.987 ; NET.6@1113.174,1683.174 cw(c1113.34,1681.164) 1114.674,1682.676 ; NET.6@1113.19,1682.974 cw(c1113.393,1680.515) 1115.026,1682.365 ; NET.6@1113.4,1683.8 1115.1,1682.3 1115.7,1682.3 1116.1,1681.9 1116.1,1680.7 1115.5,1680.1 R209.2@1115.5,1679.7 ; NET.6@1113.4,1683.9 NET.6@1113.727,1683.764 ; R209.2@1115.277,1680.215 ccw(c1115.277,1681.031) 1115.854,1680.454 ; R209.2@1115.477,1679.815 cw(c1116.11,1679.815) R209.2@1115.663,1680.263 ; R209.2@1115.6,1679.7 1115.6,1679.5 1116.1,1679 1116.1,1677 1118.2,1674.9 1126.7,1674.9 1132.096,1669.504 UT2.4@1134.703,1669.504 ; R209.2@1115.677,1679.815 cw(c1116.793,1679.815) 1116.004,1680.604
SD0_CDN: CON8.11 RS8.2 RS16.1 | length 13.6
  TopLayer w0.2: RS16.1@1187.717,1606.783 ccw(c1187.034,1607.466) 1188,1607.466 ccw(c1188.966,1607.466) RS16.1@1188.283,1606.783 ; RS8.2@1187.717,1607.717 cw(c1187.034,1607.034) 1188,1607.034 cw(c1188.966,1607.034) RS8.2@1188.283,1607.717 ; RS16.1@1188,1606.5 RS8.2@1188,1608 ; RS8.2@1188,1607.693 1188.012,1607.705 CON8.11@1191.995,1607.705 ; RS8.2@1188.05,1608 ccw(c1188.762,1608.712) 1188.762,1607.705 ; RS8.2@1188.191,1608.141 ccw(c1189.245,1609.195) 1189.245,1607.705 ; RS8.2@1188.333,1608.283 ccw(c1189.728,1609.678) 1189.728,1607.705 ; CON8.11@1190.812,1607.422 ccw(c1190.129,1606.739) 1190.129,1607.705 ccw(c1190.129,1608.671) CON8.11@1190.812,1607.988
SD0_CLK: CON8.5 CS1.1 RS3.2 RS11.2 | length 17.2
  TopLayer w0.2: RS3.2@1187.717,1600.783 ccw(c1187.034,1601.466) 1188,1601.466 ccw(c1188.966,1601.466) RS3.2@1188.283,1600.783 ; RS11.2@1187.717,1601.717 cw(c1187.034,1601.034) 1188,1601.034 cw(c1188.966,1601.034) RS11.2@1188.283,1601.717 ; RS11.2@1187.717,1602.283 ccw(c1187.034,1602.966) 1188,1602.966 ccw(c1188.966,1602.966) RS11.2@1188.283,1602.283 ; CS1.1@1187.736,1603.215 cw(c1187.098,1602.577) 1188,1602.577 ; RS3.2@1188,1600.5 CS1.1@1188,1603.5 ; RS11.2@1188,1602 1188.095,1601.905 CON8.5@1191.995,1601.905 ; RS11.2@1188,1602.488 cw(c1189.029,1602.488) CS1.1@1188.301,1603.215 ; 1188,1602.971 cw(c1188.546,1602.971) CS1.1@1188.16,1603.357 ; RS11.2@1188.191,1602.141 ccw(c1188.762,1602.712) 1188.762,1601.905 ; RS11.2@1188.333,1601.717 cw(c1188.786,1601.264) 1188.786,1601.905 ; RS11.2@1188.333,1602.283 ccw(c1189.245,1603.195) 1189.245,1601.905 ; CON8.5@1190.812,1601.622 ccw(c1190.129,1600.939) 1190.129,1601.905 ccw(c1190.129,1602.871) CON8.5@1190.812,1602.188
SD0_CMD: CON8.2 RS4.2 RS12.2 | length 12.4
  TopLayer w0.2: RS4.2@1187.717,1609.783 ccw(c1187.034,1610.466) 1188,1610.466 ccw(c1188.966,1610.466) RS4.2@1188.283,1609.783 ; RS12.2@1187.717,1610.717 cw(c1187.034,1610.034) 1188,1610.034 cw(c1188.966,1610.034) RS12.2@1188.283,1610.717 ; RS12.2@1188,1611 RS4.2@1188,1609.5 1191.358,1609.5 CON8.2@1191.387,1609.471 ; RS4.2@1188.333,1609.217 cw(c1189.016,1608.534) 1189.016,1609.5 cw(c1189.016,1610.466) RS4.2@1188.333,1609.783 ; 1189.659,1609.5 cw(c1189.659,1607.868) CON8.2@1190.812,1609.022 ; 1190.141,1609.5 cw(c1190.141,1608.351) CON8.2@1190.954,1609.164 ; CON8.2@1190.6,1609.5 ccw(c1190.6,1609.8) CON8.2@1190.812,1609.588 ; CON8.2@1190.624,1609.5 cw(c1190.624,1608.834) CON8.2@1191.095,1609.305
SD0_DATA0: CON8.7 RS2.2 RS10.2 | length 15
  TopLayer w0.2: RS10.2@1187.717,1597.783 ccw(c1187.034,1598.466) 1188,1598.466 ccw(c1188.966,1598.466) RS10.2@1188.283,1597.783 ; RS2.2@1187.717,1598.717 cw(c1187.034,1598.034) 1188,1598.034 cw(c1188.966,1598.034) RS2.2@1188.283,1598.717 ; RS10.2@1188,1597.5 RS2.2@1188,1599 ; RS10.2@1188.05,1597.5 ccw(c1188.522,1597.972) RS10.2@1188.522,1597.304 ; RS10.2@1188.161,1597.304 1191.696,1597.304 CON8.7@1191.995,1597.005 ; RS10.2@1188.191,1597.641 ccw(c1189.005,1598.455) 1189.005,1597.304 ; RS10.2@1188.333,1597.217 cw(c1188.543,1597.007) RS10.2@1188.543,1597.304 ; RS10.2@1188.333,1597.783 ccw(c1189.488,1598.938) 1189.488,1597.304 ; 1189.407,1597.304 cw(c1189.407,1595.317) CON8.7@1190.812,1596.722 ; 1189.889,1597.304 cw(c1189.889,1595.799) CON8.7@1190.954,1596.864 ; 1190.372,1597.304 cw(c1190.372,1596.282) CON8.7@1191.095,1597.005
SD0_DATA1: CON8.8 RS1.2 RS9.2 | length 11.9
  TopLayer w0.2: RS1.2@1187.717,1594.783 ccw(c1187.034,1595.466) 1188,1595.466 ccw(c1188.966,1595.466) RS1.2@1188.283,1594.783 ; RS9.2@1187.717,1595.717 cw(c1187.034,1595.034) 1188,1595.034 cw(c1188.966,1595.034) RS9.2@1188.283,1595.717 ; RS9.2@1188,1596 RS1.2@1188,1594.5 1189.065,1594.5 1189.87,1595.305 CON8.8@1191.995,1595.305 ; RS1.2@1188.333,1594.217 cw(c1189.016,1593.534) 1189.016,1594.5 cw(c1189.016,1595.466) RS1.2@1188.333,1594.783 ; CON8.8@1190.812,1595.022 ccw(c1190.129,1594.339) 1190.129,1595.305 ccw(c1190.129,1596.271) CON8.8@1190.812,1595.588
SD0_DATA2: CON8.9 RS6.2 RS14.2 | length 11.9
  TopLayer w0.2: RS6.2@1187.717,1615.783 ccw(c1187.034,1616.466) 1188,1616.466 ccw(c1188.966,1616.466) RS6.2@1188.283,1615.783 ; RS14.2@1187.717,1616.717 cw(c1187.034,1616.034) 1188,1616.034 cw(c1188.966,1616.034) RS14.2@1188.283,1616.717 ; RS14.2@1188,1617 RS6.2@1188,1615.5 1189.016,1615.5 ; RS6.2@1188.333,1615.217 cw(c1189.016,1614.535) 1189.016,1615.5 ; RS6.2@1188.333,1615.783 ccw(c1189.016,1616.465) 1189.016,1615.5 ; CON8.9@1190.795,1614.041 ccw(c1190.211,1613.527) 1190.211,1614.305 ; CON8.9@1190.795,1614.569 cw(c1190.211,1615.083) 1190.211,1614.305 ; CON8.9@1191.995,1614.305 1190.211,1614.305 ; 1189.016,1615.5 1190.211,1614.305
SD0_DATA3: CON8.1 RS5.2 RS13.2 | length 11.9
  TopLayer w0.2: RS13.2@1187.717,1612.783 ccw(c1187.034,1613.466) 1188,1613.466 ccw(c1188.966,1613.466) RS13.2@1188.283,1612.783 ; RS5.2@1187.717,1613.717 cw(c1187.034,1613.034) 1188,1613.034 cw(c1188.966,1613.034) RS5.2@1188.283,1613.717 ; RS5.2@1188,1614 RS13.2@1188,1612.5 1189.044,1612.5 1189.739,1611.805 CON8.1@1191.995,1611.805 ; RS13.2@1188.333,1612.217 cw(c1189.016,1611.534) 1189.016,1612.5 cw(c1189.016,1613.466) RS13.2@1188.333,1612.783 ; CON8.1@1190.812,1611.522 ccw(c1190.129,1610.839) 1190.129,1611.805 ccw(c1190.129,1612.771) CON8.1@1190.812,1612.088
SD0_WPN: CON8.10 RS7.2 RS15.1 | length 16.2
  TopLayer w0.2: RS15.1@1187.717,1591.783 ccw(c1187.034,1592.466) 1188,1592.466 ccw(c1188.966,1592.466) RS15.1@1188.283,1591.783 ; RS7.2@1187.717,1592.717 cw(c1187.034,1592.034) 1188,1592.034 cw(c1188.966,1592.034) RS7.2@1188.283,1592.717 ; RS7.2@1188.105,1593.105 RS7.2@1188,1593 RS15.1@1188,1591.5 1191.171,1591.5 CON8.10@1191.26,1591.589 ; RS15.1@1188.333,1591.217 cw(c1189.016,1590.534) 1189.016,1591.5 cw(c1189.016,1592.466) RS15.1@1188.333,1591.783 ; 1189.01,1591.5 ccw(c1189.01,1594.09) CON8.10@1190.841,1592.259 ; 1189.493,1591.5 ccw(c1189.493,1593.607) CON8.10@1190.983,1592.117 ; 1189.976,1591.5 ccw(c1189.976,1593.124) CON8.10@1191.124,1591.976 ; 1190.459,1591.5 ccw(c1190.459,1592.641) CON8.10@1191.266,1591.834 ; CON8.10@1191.165,1591.905 CON8.10@1191.995,1591.905
SD3_CDN: RW7.2 RW15.2 WIFI2.10 | length 20.5
  TopLayer w0.2: RW7.2@1208.568,1638.412 ccw(c1208.733,1639.01) 1209.171,1638.571 ; RW7.2@1208.571,1638.605 1209.205,1638.605 ; RW7.2@1208.621,1638.605 ccw(c1208.838,1639.39) 1209.414,1638.814 ; RW7.2@1208.675,1638.798 ccw(c1208.943,1639.771) 1209.657,1639.057 ; RW7.2@1208.728,1638.991 ccw(c1209.048,1640.152) 1209.9,1639.3 ; RW7.2@1208.995,1638.461 cw(c1209.205,1638.379) 1209.205,1638.605 ; RW7.2@1208.995,1638.749 ccw(c1209.205,1638.831) 1209.205,1638.605 ; 1211.603,1639.173 cw(c1210.835,1638.405) RW15.2@1211.921,1638.405 ; 1211.724,1639.052 ccw(c1212.321,1639.65) RW15.2@1212.321,1638.805 ; RW15.2@1211.945,1638.832 cw(c1211.518,1638.405) RW15.2@1212.121,1638.405 ; RW15.2@1212.704,1638.122 cw(c1213.387,1637.439) 1213.387,1638.405 cw(c1213.387,1639.371) RW15.2@1212.704,1638.688 ; WIFI2.10@1216.012,1636.088 ccw(c1214.805,1636.088) 1215.658,1636.942 ccw(c1216.512,1637.795) WIFI2.10@1216.512,1636.588 ; WIFI2.10@1216.212,1636.088 ccw(c1215.487,1636.088) 1215.999,1636.6 ccw(c1216.512,1637.112) WIFI2.10@1216.512,1636.388 ; WIFI2.10@1216.512,1636.088 1214.195,1638.405 RW15.2@1212.371,1638.405 1211.476,1639.3 1209.9,1639.3 ; 1209.205,1638.605 1209.9,1639.3
SD3_CLK: CW4.2 RW3.2 RW11.2 WIFI2.8 | length 22.6
  TopLayer w0.2: RW3.2@1208.643,1635.219 1209.381,1635.219 1210,1634.6 1211.541,1634.6 RW11.2@1212.415,1635.474 1215.126,1635.474 WIFI2.8@1216.512,1634.088 ; RW3.2@1209.041,1635.021 cw(c1209.381,1634.828) 1209.381,1635.219 cw(c1209.381,1635.61) RW3.2@1209.041,1635.417 ; CW4.2@1210.665,1636.995 1210.805,1636.995 RW11.2@1212.1,1635.7 ; CW4.2@1210.715,1636.595 cw(c1210.715,1635.413) 1211.551,1636.249 ; CW4.2@1210.715,1636.795 cw(c1210.715,1636.096) CW4.2@1211.21,1636.59 ; CW4.2@1211.115,1636.995 ccw(c1211.865,1636.995) 1211.335,1636.465 ; 1211.616,1636.184 ccw(c1212.365,1636.933) RW11.2@1212.365,1635.874 ; 1211.646,1634.706 ccw(c1210.878,1635.474) 1211.965,1635.474 ccw(c1211.092,1635.474) 1211.709,1636.091 ; 1211.767,1634.827 cw(c1212.365,1634.229) RW11.2@1212.365,1635.074 ; RW11.2@1211.957,1635.843 ccw(c1212.365,1636.25) RW11.2@1212.365,1635.674 ; RW11.2@1211.988,1635.047 ccw(c1211.561,1635.474) RW11.2@1212.165,1635.474 ; RW11.2@1212.378,1635.511 RW11.2@1212.501,1635.388 ; RW11.2@1212.748,1635.191 cw(c1213.43,1634.508) 1213.43,1635.474 cw(c1213.43,1636.44) RW11.2@1212.748,1635.757 ; WIFI2.8@1216.012,1634.088 ccw(c1214.805,1634.088) 1215.658,1634.942 ccw(c1216.512,1635.795) WIFI2.8@1216.512,1634.588 ; WIFI2.8@1216.212,1634.088 ccw(c1215.487,1634.088) 1215.999,1634.6 ccw(c1216.512,1635.112) WIFI2.8@1216.512,1634.388
SD3_CMD: RW4.2 RW12.2 WIFI2.12 | length 17.3
  TopLayer w0.2: RW4.2@1208.543,1640.169 1209.431,1640.169 ; RW4.2@1208.904,1639.918 cw(c1209.431,1639.492) 1209.431,1640.169 ; RW4.2@1208.904,1640.42 ccw(c1209.431,1640.846) 1209.431,1640.169 ; 1211.603,1639.837 ccw(c1210.835,1640.605) RW12.2@1211.921,1640.605 ; 1211.724,1639.958 cw(c1212.321,1639.36) RW12.2@1212.321,1640.205 ; RW12.2@1211.945,1640.178 ccw(c1211.518,1640.605) RW12.2@1212.121,1640.605 ; RW12.2@1212.704,1640.322 cw(c1213.387,1639.639) 1213.387,1640.605 cw(c1213.387,1641.571) RW12.2@1212.704,1640.888 ; WIFI2.12@1216.012,1638.088 ccw(c1214.805,1638.088) 1215.658,1638.942 ccw(c1216.512,1639.795) WIFI2.12@1216.512,1638.588 ; WIFI2.12@1216.212,1638.088 ccw(c1215.487,1638.088) 1215.999,1638.6 ccw(c1216.512,1639.112) WIFI2.12@1216.512,1638.388 ; WIFI2.12@1216.512,1638.088 1213.995,1640.605 RW12.2@1212.371,1640.605 1211.466,1639.7 1209.9,1639.7 1209.431,1640.169
SD3_DATA0: RW2.2 RW10.2 WIFI2.6 | length 16.6
  TopLayer w0.2: RW2.2@1208.643,1633.719 1209.419,1633.719 ; RW2.2@1209.031,1633.505 cw(c1209.419,1633.261) 1209.419,1633.719 ; RW2.2@1209.031,1633.933 ccw(c1209.419,1634.177) 1209.419,1633.719 ; 1211.595,1633.994 cw(c1210.806,1633.205) RW10.2@1211.921,1633.205 ; 1211.745,1633.844 ccw(c1212.321,1634.421) RW10.2@1212.321,1633.605 ; RW10.2@1211.936,1633.653 cw(c1211.488,1633.205) RW10.2@1212.121,1633.205 ; RW10.2@1212.415,1633.174 1212.384,1633.205 1212.378,1633.211 1211.389,1634.2 1209.9,1634.2 1209.419,1633.719 ; RW10.2@1212.454,1633.288 RW10.2@1212.371,1633.205 1215.395,1633.205 WIFI2.6@1216.512,1632.088 ; RW10.2@1212.704,1632.922 cw(c1213.387,1632.239) 1213.387,1633.205 cw(c1213.387,1634.171) RW10.2@1212.704,1633.488 ; WIFI2.6@1216.012,1632.088 ccw(c1214.805,1632.088) 1215.658,1632.942 ccw(c1216.512,1633.795) WIFI2.6@1216.512,1632.588 ; WIFI2.6@1216.212,1632.088 ccw(c1215.487,1632.088) 1215.999,1632.6 ccw(c1216.512,1633.112) WIFI2.6@1216.512,1632.388
SD3_DATA1: RW1.2 RW9.2 WIFI2.4 | length 16.2
  TopLayer w0.2: RW1.2@1208.743,1631.269 1209.431,1631.269 ; RW1.2@1209.153,1631.095 cw(c1209.431,1630.961) 1209.431,1631.269 ; RW1.2@1209.153,1631.443 ccw(c1209.431,1631.577) 1209.431,1631.269 ; 1211.603,1631.037 ccw(c1210.835,1631.805) RW9.2@1211.921,1631.805 ; 1211.724,1631.158 cw(c1212.321,1630.56) RW9.2@1212.321,1631.405 ; RW9.2@1211.945,1631.378 ccw(c1211.518,1631.805) RW9.2@1212.121,1631.805 ; RW9.2@1212.704,1631.522 cw(c1213.387,1630.839) 1213.387,1631.805 cw(c1213.387,1632.771) RW9.2@1212.704,1632.088 ; WIFI2.4@1216.012,1630.088 ccw(c1214.805,1630.088) 1215.658,1630.942 ccw(c1216.512,1631.795) WIFI2.4@1216.512,1630.588 ; WIFI2.4@1216.212,1630.088 ccw(c1215.487,1630.088) 1215.999,1630.6 ccw(c1216.512,1631.112) WIFI2.4@1216.512,1630.388 ; WIFI2.4@1216.512,1630.088 1214.795,1631.805 RW9.2@1212.371,1631.805 1211.466,1630.9 1209.8,1630.9 1209.431,1631.269
SD3_DATA2: RW6.2 RW14.2 WIFI2.16 | length 17.5
  TopLayer w0.2: RW6.2@1208.6,1644 1209.5,1644 ; RW6.2@1208.958,1643.745 cw(c1209.5,1643.297) 1209.5,1644 ; RW6.2@1208.958,1644.255 ccw(c1209.5,1644.703) 1209.5,1644 ; 1211.603,1643.637 ccw(c1210.835,1644.405) RW14.2@1211.921,1644.405 ; 1211.724,1643.758 cw(c1212.321,1643.16) RW14.2@1212.321,1644.005 ; RW14.2@1211.945,1643.978 ccw(c1211.518,1644.405) RW14.2@1212.121,1644.405 ; RW14.2@1212.704,1644.122 cw(c1213.387,1643.439) 1213.387,1644.405 cw(c1213.387,1645.371) RW14.2@1212.704,1644.688 ; WIFI2.16@1216.183,1642.465 ccw(c1215.551,1643.188) 1216.512,1643.188 ; WIFI2.16@1216.314,1642.314 ccw(c1215.935,1642.748) 1216.512,1642.748 ccw(c1217.088,1642.748) WIFI2.16@1216.709,1642.314 ; WIFI2.16@1216.512,1642.088 1216.512,1643.188 ; WIFI2.16@1216.84,1642.465 cw(c1217.472,1643.188) 1216.512,1643.188 ; 1209.5,1644 1210.1,1643.4 1211.366,1643.4 RW14.2@1212.371,1644.405 1215.295,1644.405 1216.512,1643.188
SD3_DATA3: RW5.2 RW13.2 WIFI2.14 | length 17
  TopLayer w0.2: RW5.2@1208.593,1642.569 1209.469,1642.569 ; RW5.2@1208.957,1642.321 cw(c1209.469,1641.917) 1209.469,1642.569 ; RW5.2@1208.957,1642.817 ccw(c1209.469,1643.221) 1209.469,1642.569 ; 1211.566,1642.895 cw(c1210.798,1642.127) RW13.2@1211.885,1642.127 ; 1211.687,1642.775 ccw(c1212.285,1643.372) RW13.2@1212.285,1642.527 ; RW13.2@1211.908,1642.554 cw(c1211.481,1642.127) RW13.2@1212.085,1642.127 ; RW13.2@1212.668,1641.844 cw(c1213.35,1641.162) 1213.35,1642.127 cw(c1213.35,1643.093) RW13.2@1212.668,1642.41 ; WIFI2.14@1216.012,1640.088 ccw(c1214.805,1640.088) 1215.658,1640.942 ccw(c1216.512,1641.795) WIFI2.14@1216.512,1640.588 ; WIFI2.14@1216.212,1640.088 ccw(c1215.487,1640.088) 1215.999,1640.6 ccw(c1216.512,1641.112) WIFI2.14@1216.512,1640.388 ; WIFI2.14@1216.512,1640.088 1214.472,1642.127 RW13.2@1212.335,1642.127 1211.462,1643 1209.9,1643 1209.469,1642.569